# Altium PCB Main.PcbDoc
Units mm, origin at the board's own origin, x right, y up, seen from the top; angles counter-clockwise.
Board outline 29.4 x 44 mm, 2 copper layers (Top Layer, Bottom Layer); 25 components, 25 nets, 85 pads, 11 vias.
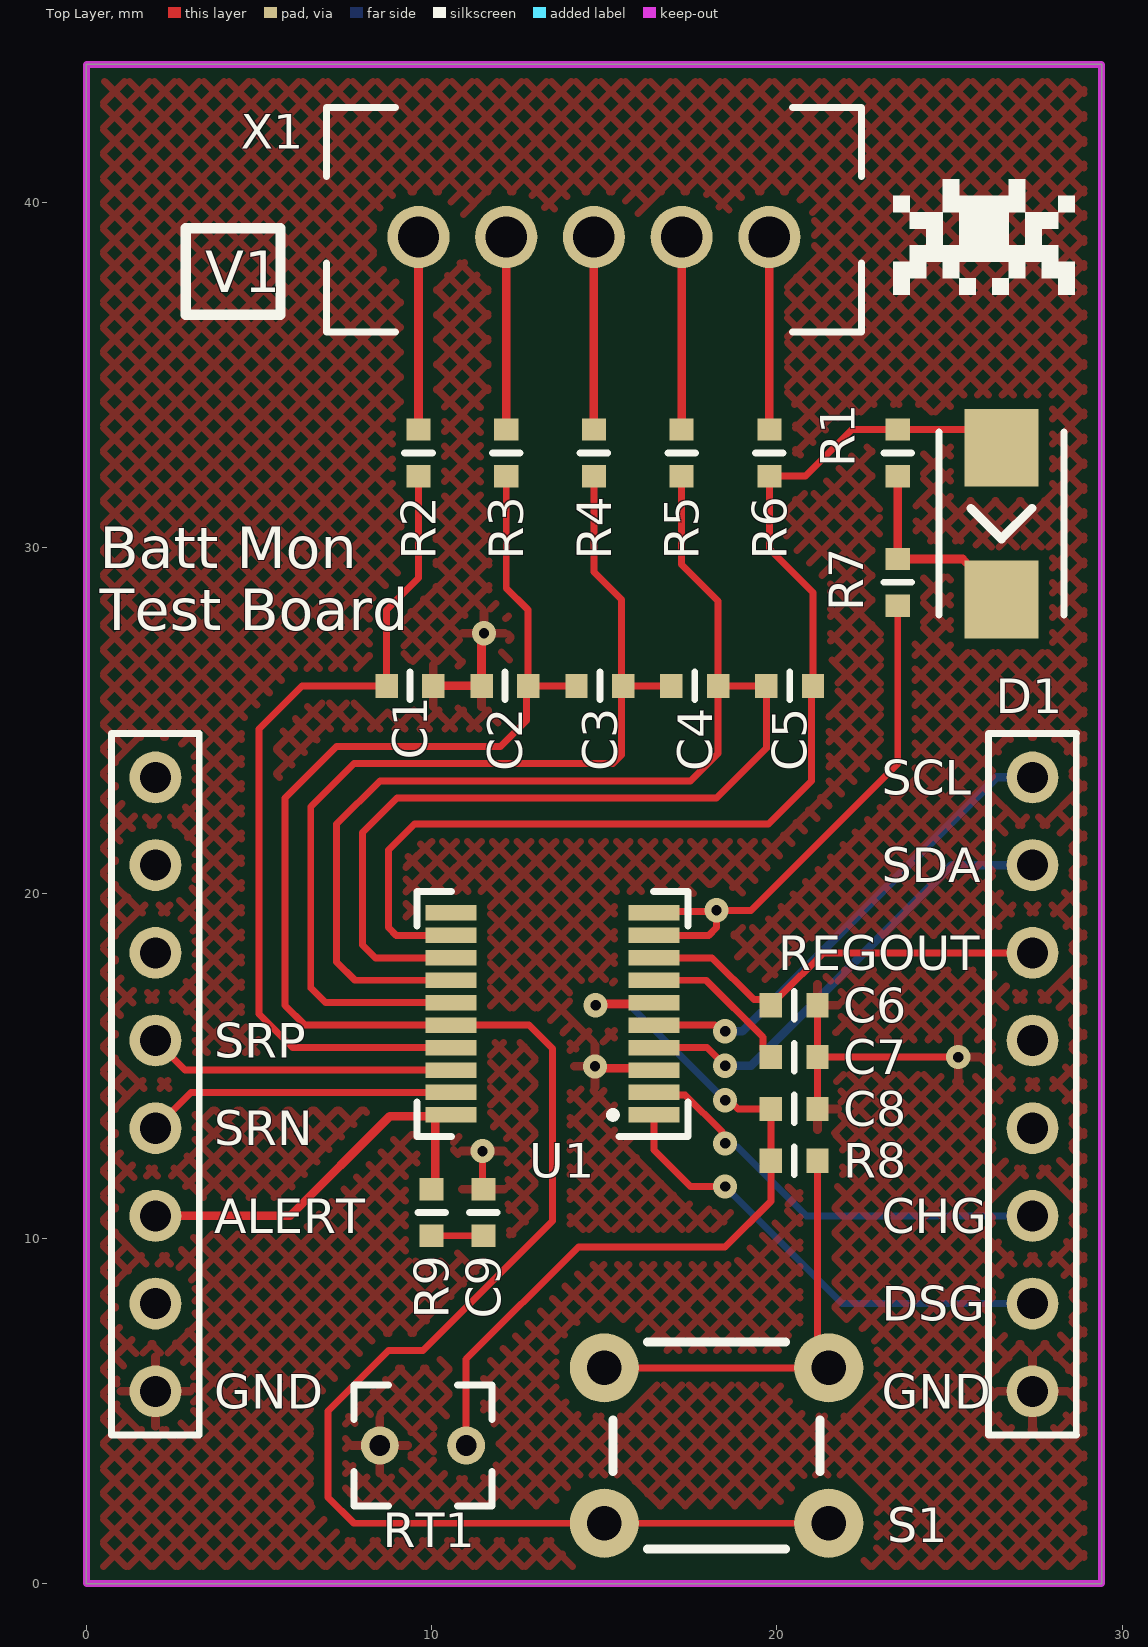
[diagram p0: Top Layer view]
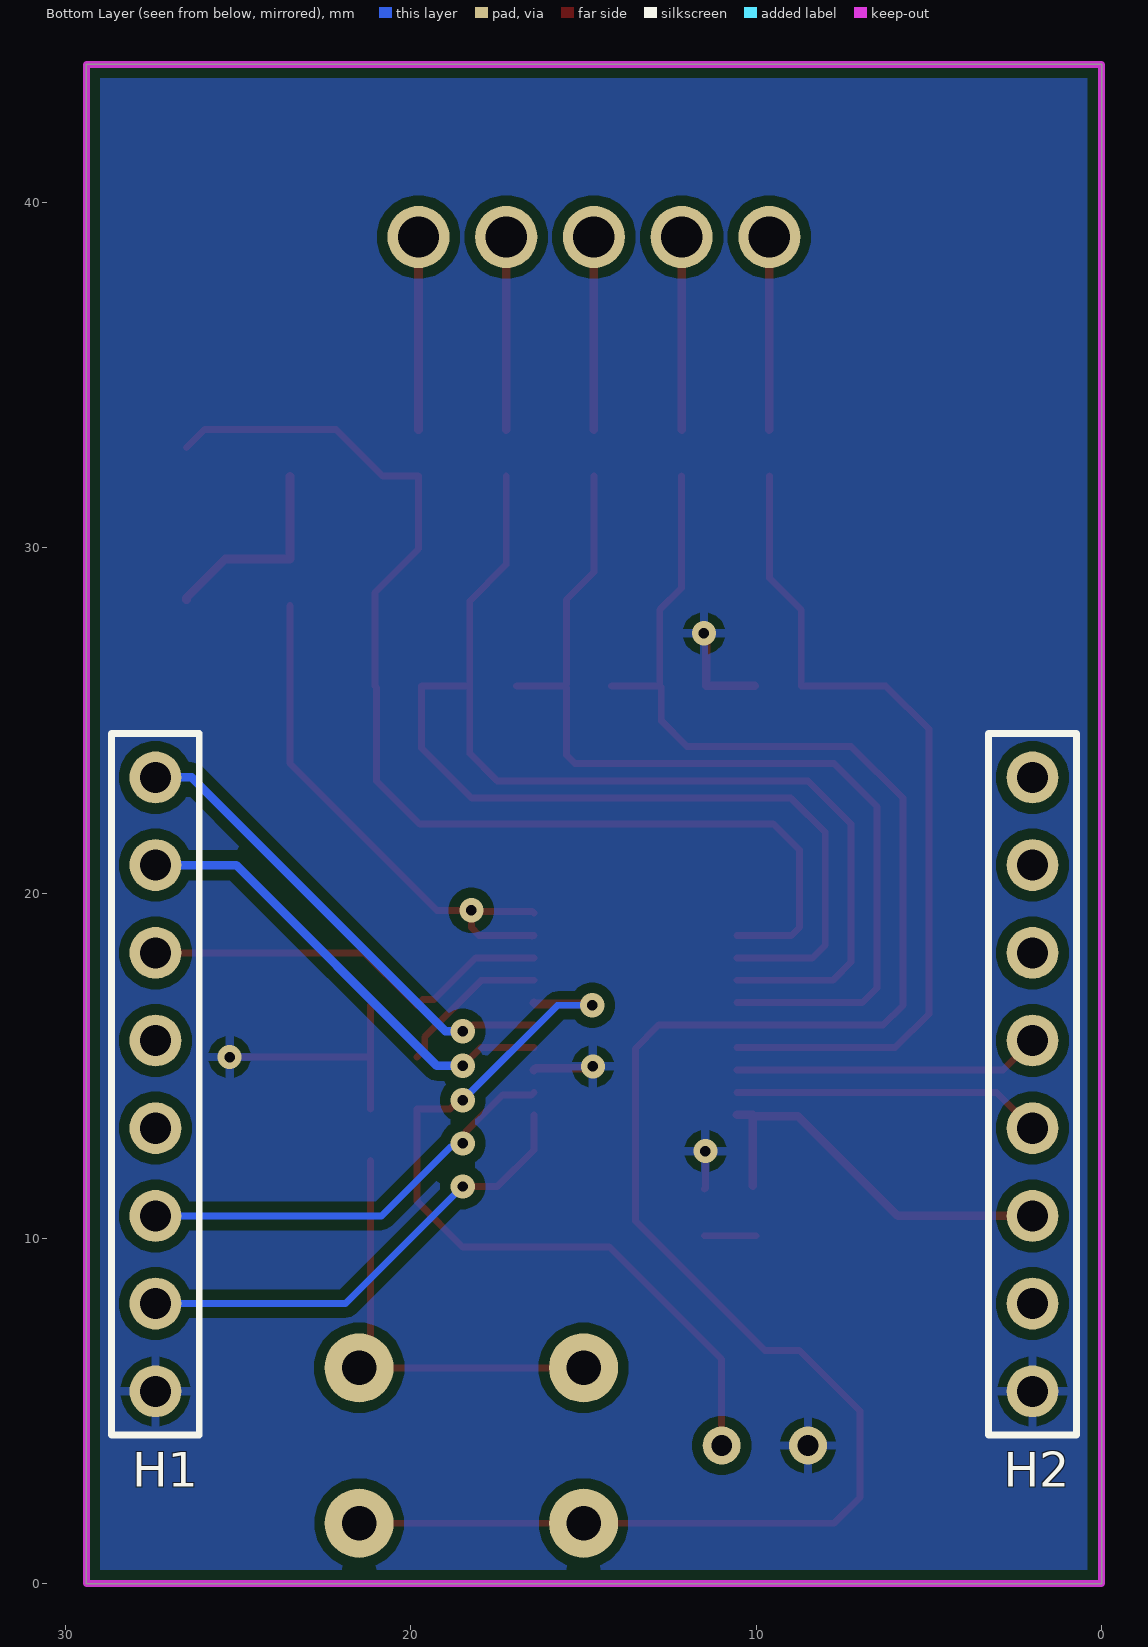
[diagram p1: Bottom Layer view, seen from below]
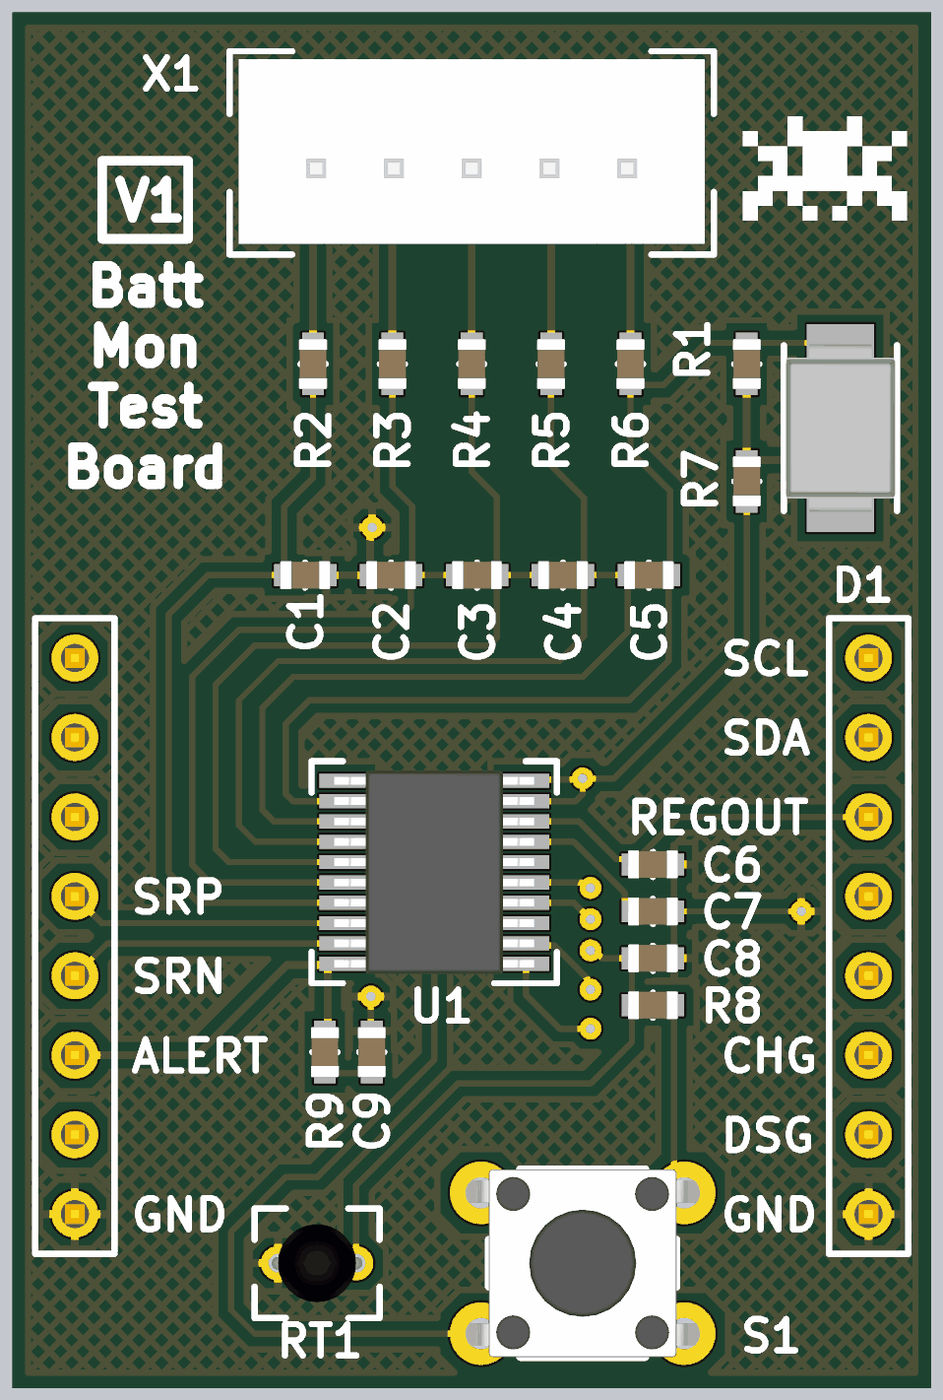
[diagram p2: 3D render of the assembled board from above, using the file's embedded part models]

## Layer stack, top to bottom
Top Solder: solder mask 0.0102, Solder Resist, Dk 3.5
Top Layer: signal copper 0.0356
Dielectric 1: dielectric 0.32, FR-4, Dk 4.8
Bottom Layer: signal copper 0.0356
Bottom Solder: solder mask 0.0102, Solder Resist, Dk 3.5

## Board outline
0,0 0,44 29.4,44 29.4,0

## Design rules (kind name [scope] priority, off if disabled: settings)
BoardOutlineClearance [All] p1: gap=0.2 ignorepadtopadclearanceinfootprint=FALSE
Clearance "inPolygon Clearance" [InPolygon] p1: gap=0.3 ignorepadtopadclearanceinfootprint=TRUE // this rule ensures that every net within a polygon of a different net has a set clearance from the poly
Clearance "Different Diff Pair" [All] p2: gap=0.2 ignorepadtopadclearanceinfootprint=TRUE
Clearance "Same Diff Pair" [All] p3: gap=0.1 ignorepadtopadclearanceinfootprint=TRUE
Clearance "Different Nets" [not InAnyDifferentialPair] p4: gap=0.3 ignorepadtopadclearanceinfootprint=TRUE except(0.1: Arc-SMDPad Arc-THPad Arc-Via Arc-Text Track-SMDPad Track-THPad Track-Via Track-Text SMDPad-Text THPad-Text Via-Text Fill-Text Poly-Text Region-Text Text-Text; 0.12: Arc-Arc Arc-Track Track-Track; 0.15: SMDPad-SMDPad SMDPad-THPad SMDPad-Via THPad-THPad THPad-Via Via-Via; 0.2: Arc-Hole Track-Hole SMDPad-Hole THPad-Hole Via-Hole Fill-Hole Poly-Hole Region-Hole Text-Hole)
Clearance "Same Net" [not InAnyDifferentialPair] p5: gap=0 ignorepadtopadclearanceinfootprint=TRUE except(0.1: THPad-Via; 0.18: Arc-Arc Arc-Track Track-Track)
ComponentClearance [All] p1: gap=0.102 collisioncheckmode=3 verticalgap=0.102 showdistances=TRUE
DiffPairsRouting "Ethernet Routing" [InDifferentialPairClass('Ethernet_Pairs')] p1: maxlimit=0.2 minlimit=0.2 mostfreqgap=0.2 toplayer_minwidth=0.25 toplayer_maxwidth=0.25 toplayer_prefwidth=0.25 bottomlayer_minwidth=0.25 bottomlayer_maxwidth=0.25 bottomlayer_prefwidth=0.25 impedanceprofiledriven=TRUE maxuncoupledlength=12.7
DiffPairsRouting "USB Routing" [InDifferentialPairClass('USB_Pairs')] p2: maxlimit=0.127 minlimit=0.127 mostfreqgap=0.127 toplayer_minwidth=0.23 toplayer_maxwidth=0.23 toplayer_prefwidth=0.23 bottomlayer_minwidth=0.23 bottomlayer_maxwidth=0.23 bottomlayer_prefwidth=0.23 impedanceprofiledriven=TRUE impedanceprofileid={F14BA31F-77FA-453E-8734-53F45B48A614} maxuncoupledlength=12.7
DiffPairsRouting "CAN Routing" [InDifferentialPairClass('CAN_Pairs')] p3: maxlimit=0.5 minlimit=0.5 mostfreqgap=0.5 toplayer_minwidth=0.201 toplayer_maxwidth=0.201 toplayer_prefwidth=0.201 bottomlayer_minwidth=0.201 bottomlayer_maxwidth=0.201 bottomlayer_prefwidth=0.201 maxuncoupledlength=12.7
Height [All] p1: minheight=0 maxheight=1816.048 prefheight=12.7
HoleSize [All] p1: absolutevalues=TRUE maxlimit=6.3 minlimit=0.3 maxpercent=80.000 minpercent=20.000
HoleToHoleClearance [All] p1: gap=0.25 allowstackedmicrovias=FALSE
Length [All] p1: maxlimit=43.432 minlimit=0 usedelayunits=TRUE mindelay=0.000000 maxdelay=10000.000000
MatchedLengths "Diff Pair Matched Delays" [InDifferentialPairClass('Ethernet_Pairs') or InDifferentialPairClass('USB_Pairs') or InDifferentialPairClass('CAN_Pairs')] p1: tolerance=5 checknetsindiffpair=TRUE checkdiffpairvsdiffpair=FALSE checkxsignals=FALSE checkothers=FALSE usedelayunits=TRUE delaytolerance=100.000000
MinimumAnnularRing [All] p1: minimumring=0.2
MinimumSolderMaskSliver [All] p1: minsoldermaskwidth=0
PlaneClearance "Supply Net Clearance" [InNetClass('Supply_Nets')] p1: clearance=0.5
PlaneClearance "All Nets" [All] p2: clearance=0.3
PolygonConnect "Supply Nets" [InNetClass('Supply_Nets')] p1: connectstyle=Relief reliefconductorwidth=0.3 reliefentries=4 polygonreliefangle="90 Angle" conductorbypadedge=TRUE mindistance=0.381 enablemindistance=FALSE airgapwidth=0.254
PolygonConnect General [All] p2: connectstyle=Relief reliefconductorwidth=0.254 reliefentries=4 polygonreliefangle="90 Angle" airgapwidth=0.254
RoutingVias [All] p1: holewidth=0.2 width=0.35 viastyle="Through Hole" minholewidth=0.15 minwidth=0.3 maxholewidth=6.3 maxwidth=6.55
SilkToSilkClearance [All] p1: silktosilkclearance=0
SilkToSolderMaskClearance [All] p1: minsilkscreentomaskgap=0 clearancetoexposedcopper=TRUE
SolderMaskExpansion [All] p1: expansion=0.075 istentingtop=FALSE
SupplyNets "Schematic Supply Nets_3" [InNet('GND')] p1: voltage=0.000
UnRoutedNet [All] p1: checkbadconnections=TRUE
Width "nRF Width" [InNetClass('nRF Signal')] p1: maxlimit=0.379 minlimit=0.379 preferedwidth=0.379 impedanceprofiledriven=TRUE minimp=50.000000 maximp=50.000000 favimp=50.000000 checkconnectedcopper=TRUE
Width [All] p2: maxlimit=100 minlimit=0.1 preferedwidth=0.3
20 further rules are at their usual default settings.

## Classes and differential pairs
component class Connectors: H1 H2 X1
component class "Battery Monitoring": C1 C2 C3 C4 C5 C6 C7 C8 C9 D1 R1 R2 R3 R4 R5 R6 R7 R8 R9 RT1 S1 U1

## Components (designator, comment, footprint, x,y, rotation, side; value= is the part's Value field where it differs from the comment)
C1 "[Cap] 0603 1uF 10% 50V" "[Cap] SMD 0603" 9.37,26 r0 top (schematic designator C30)
C2 "[Cap] 0603 1uF 10% 50V" "[Cap] SMD 0603" 12.12,26 r0 top (schematic designator C29)
C3 "[Cap] 0603 1uF 10% 50V" "[Cap] SMD 0603" 14.87,26 r0 top (schematic designator C28)
C4 "[Cap] 0603 1uF 10% 50V" "[Cap] SMD 0603" 17.62,26 r0 top (schematic designator C27)
C5 "[Cap] 0603 1uF 10% 50V" "[Cap] SMD 0603" 20.37,26 r0 top (schematic designator C25)
C6 "[Cap] 0603 4.7uF 10% 25V" "[Cap] SMD 0603" 20.5,16.75 r180 top (schematic designator C26)
C7 "[Cap] 0603 1uF 10% 50V" "[Cap] SMD 0603" 20.5,15.25 r180 top (schematic designator C31)
C8 "[Cap] 0603 4700pF 5% 50V" "[Cap] SMD 0603" 20.5,13.75 r180 top (schematic designator C32)
C9 "[Cap] 0603 470pF 5% 50V" "[Cap] SMD 0603" 11.5,10.75 r270 top (schematic designator C33)
D1 "Rectifier" "[Diode] SMD DO-214AA" 26.5,30.7 r270 top
H1 "1x8 Header" "[Header] 1x8 Male" 27.4,23.35 r270 bottom (schematic designator H2)
H2 "1x8 Header" "[Header] 1x8 Male" 2,23.35 r270 bottom (schematic designator H1)
R1 "[10k] SMD 0603 1% 1/8W" "[Res] SMD 0603" 23.5,32.75 r90 top (schematic designator R15)
R2 "[100] SMD 0603 1% 1/10W" "[Res] SMD 0603" 9.62,32.75 r270 top (schematic designator R14)
R3 "[100] SMD 0603 1% 1/10W" "[Res] SMD 0603" 12.16,32.75 r270 top (schematic designator R13)
R4 "[100] SMD 0603 1% 1/10W" "[Res] SMD 0603" 14.7,32.75 r270 top (schematic designator R12)
R5 "[100] SMD 0603 1% 1/10W" "[Res] SMD 0603" 17.24,32.75 r270 top (schematic designator R11)
R6 "[100] SMD 0603 1% 1/10W" "[Res] SMD 0603" 19.78,32.75 r270 top (schematic designator R10)
R7 "[100] SMD 0603 1% 1/10W" "[Res] SMD 0603" 23.5,29 r270 top (schematic designator R16)
R8 "[3.3k] SMD 0603 1% 1/10W" "[Res] SMD 0603" 20.5,12.25 r180 top (schematic designator R17)
R9 "[499k] SMD 0603 1% 1/8W" "[Res] SMD 0603" 10,10.75 r270 top (schematic designator R18)
RT1 "[NTC] 10k Thru-Hole" "[NTC] 10k Thru-Hole" 9.75,4 r0 top
S1 "Standard pushbutton" "[SPST] Pushbutton" 18.25,4 r0 top (schematic designator S3)
U1 "[Batt Mon] 3-5 Cell BMS" "[Batt Mon] 3-5 Cell BMS" 13.5,16.5 r180 top (schematic designator U5)
X1 "[JST] 5pin Female" "[JST] 5pin Female" 14.7,39 r0 top (schematic designator X4)

## Footprints (in the part's own frame and the unit in brackets; to place one, negate y for a bottom-side part, rotate by r counter-clockwise, add the part's x,y. Pads: shape width x height; smd on the part's side, far side on the other; paste and mask are expansions set on the pad)
"[Batt Mon] 3-5 Cell BMS" [mm] "BQ7692006PWR"
  rect 1.475x0.45 smd: 1(-2.938,2.925) 2(-2.938,2.275) 3(-2.938,1.625) 4(-2.938,0.975) 5(-2.938,0.325) 6(-2.938,-0.325) 7(-2.938,-0.975) 8(-2.938,-1.625) 9(-2.938,-2.275) 10(-2.938,-2.925) 11(2.938,-2.925) 12(2.938,-2.275) 13(2.938,-1.625) 14(2.938,-0.975) 15(2.938,-0.325) 16(2.938,0.325) 17(2.938,0.975) 18(2.938,1.625) 19(2.938,2.275) 20(2.938,2.925)
  silkscreen extent -3.92,-3.55 3.93,3.55, body extent -3.2,-3.25 3.2,3.25, height 1.13
"[Cap] SMD 0603" [mm]
  rect 0.65x0.7 smd: 1(-0.675,0) 2(0.675,0)
  silkscreen extent 0,-0.4 0,0.4, body extent -0.8,-0.45 0.8,0.45, height 0.8
"[Diode] SMD DO-214AA" [mm]
  rect 2.25x2.15 smd: 1(2.2,0) 2(-2.2,0)
  silkscreen extent -2.65,-1.81 2.65,1.81, body extent -2.68,-1.75 2.68,1.75, height 2.3
"[Header] 1x8 Male" [mm]
  round 1.5 hole 0.9: 1(0,0) 2(2.54,0) 3(5.08,0) 4(7.62,0) 5(10.16,0) 6(12.7,0) 7(15.24,0) 8(17.78,0)
  silkscreen extent -1.27,-1.27 19.05,1.27, body extent -1.27,-1.27 19.05,1.27, height 9.5
"[JST] 5pin Female" [mm]
  round 1.8 hole 1.2: 1(-5.08,0) 2(-2.54,0) 3(0,0) 4(2.54,0) 5(5.08,0)
  silkscreen extent -7.75,-2.75 7.75,3.75, body extent -7.45,-2.41 7.45,3.5, height 7.14
"[NTC] 10k Thru-Hole" [mm]
  round 1.1 hole 0.6: 1(-1.25,0) 2(1.25,0)
  silkscreen extent -2,-1.75 2,1.75, body extent -1.45,-1.25 1.45,1.25, height 7.81
"[Res] SMD 0603" [mm]
  rect 0.65x0.7 smd: 1(-0.675,0) 2(0.675,0)
  silkscreen extent 0,-0.4 0,0.4, body extent -0.8,-0.45 0.8,0.45, height 0.8
"[SPST] Pushbutton" [mm] "(Regular pushbutton)"
  round 2 hole 1: 1(-3.25,2.25) 1(3.25,2.25) 2(-3.25,-2.25) 2(3.25,-2.25)
  silkscreen extent -3,-3 3,3, body extent -3.85,-3 3.85,3, height 4.95

## Part data
C1 C2 C3 C4 C5 C7: "UMK107AB7105KA-T", Capacitance=1uF, Max Voltage=50V, Size Package=0603, Supplier Part Number 1=587-3247-1-ND, Tolerance=10%, Supplier 1=DigiKey
C6: "GRM188R61E475KE11D", Capacitance=4.7uF, Max Voltage=25V, Size Package=0603, Supplier Part Number 1=490-7203-6-ND, Tolerance=10%, Supplier 1=DigiKey
C8: "GRM1885C1H472JA01D", Capacitance=4700pF, Max Voltage=50V, Size Package=0603, Supplier Part Number 1=490-9669-6-ND, Tolerance=5%, Supplier 1=DigiKey
C9: "C0603C471J5GACTU", Capacitance=470pF, Max Voltage=50V, Size Package=0603, Supplier Part Number 1=399-C0603C471J5GACTUDKR-ND, Tolerance=5%, Supplier 1=DigiKey
D1: library part "[Rectifier] SMD 1000V 1A", "S1MB-13-F", Package=DO-214AA, Supplier Part Number 1=S1MB-FDICT-ND, Supplier 1=DigiKey
H1 H2: library part "[Header] 1x8 Male", "2.54mm pitch"
R1: "RMCF0603FT10K0", Resistance=10k, Size Package=0603, Supplier Part Number 1=RMCF0603FT10K0DKR-ND, Tolerance=1%, Supplier 1=DigiKey, Wattage=1/10W
R2 R3 R4 R5 R6 R7: "RC0603FR-07100RL", Resistance=100, Size Package=0603, Supplier Part Number 1=311-100HRDKR-ND, Tolerance=1%, Supplier 1=DigiKey, Wattage=1/10W
R8: "RC0603FR-073K3L", Resistance=3.3k, Size Package=0603, Supplier Part Number 1=311-3.30KHRCT-ND, Tolerance=1%, Supplier 1=DigiKey, Wattage=1/10W
R9: "CRCW0603499KFKEA", Resistance=499k, Size Package=0603, Supplier Part Number 1=541-499KHCT-ND, Tolerance=1%, Supplier 1=DigiKey, Wattage=1/8W
RT1: "B57164K0103J000", Max Resistance=10k, Size Package=Thru-Hole, Supplier Part Number 1=495-2080-ND, Supplier 1=DigiKey, Thermistor Type=NTC
S1: library part "[SPST] Pushbutton", Supplier Part Number 1=450-1650-ND, Supplier 1=DigiKey
U1: "BQ7692006PWR", Supplier Part Number 1=296-39960-1-ND, Supplier 1=DigiKey

## Via types
v1: diameter 0.7, hole 0.3, Top Layer to Bottom Layer, 11 vias

## Nets (pads, with @x,y where several pads share a name; then routed paths per layer and width w, separated by ;. In a path a pad name is that pad's centre, name@x,y a point inside that pad or via, vN(x,y) a via of type N, cw(c..) or ccw(c..) an arc to the next point about the centre after c; other vN are vias at no path point)
ALERT: C9.2 R9.2 | length 1.5
  Top Layer w0.2: R9.2 C9.2
ALERT_PIN: H2.6 R9.1 U1.20 | length 11.7
  Top Layer w0.25: H2.6 5.9,10.65 8.787,13.537 U1.20@10,13.537 ; R9.1@10.1,11.525 10.1,13.575 U1.20
BAT: R7.2 U1.9 U1.10 | length 15.9
  Top Layer w0.2: U1.9 16.475,18.775 16.5,18.75 16.525,18.775 18.025,18.775 18.25,19 v1(18.25,19.5) ; U1.10 16.475,19.462 18.212,19.462 v1(18.25,19.5) ; R7.2 23.5,23.75 19.25,19.5 v1(18.25,19.5)
Cell0: R2.1 X1.1 | length 5.6
  Top Layer w0.25: R2.1 X1.1
Cell1: R3.1 X1.2 | length 5.6
  Top Layer w0.25: R3.1 X1.2
Cell2: R4.1 X1.3 | length 5.6
  Top Layer w0.25: R4.1 X1.3
Cell3: R5.1 X1.4 | length 5.6
  Top Layer w0.25: R5.1 X1.4
Cell4: R6.1 X1.5 | length 5.6
  Top Layer w0.25: R6.1 X1.5
CHG: H1.6 U1.2 | length 12.6
  Top Layer w0.2: U1.2 16.507,14.156 17.344,14.156 18.404,13.096 18.404,12.846 v1(18.5,12.75)
  Bottom Layer w0.2: v1(18.5,12.75) 18.596,12.654 18.846,12.654 20.85,10.65 H1.6
DSG: H1.7 U1.1 | length 13.8
  Top Layer w0.2: U1.1 16.438,12.562 17.5,11.5 v1(18.5,11.5)
  Bottom Layer w0.2: v1(18.5,11.5) 21.89,8.11 H1.7
GND: C1.2 C2.1 C6.1 C7.1 C8.1 C9.1 H1.8 H2.8 RT1.1 U1.3 | length 12.9
  Top Layer w0.2: v1(11.473,12.527) 11.473,11.452 C9.1 ; C8.1 C7.1 ; C6.1 C7.1 ; v1(25.25,15.25) C7.1
  Top Layer w0.25: C1.2 C2.1 11.445,27.452 v1(11.515,27.522) ; v1(14.731,14.981) 14.784,14.928 16.385,14.928 U1.3
NetC7_2: C7.2 U1.7 | length 4.5
  Top Layer w0.2: U1.7 17.95,17.475 19.6,15.825 19.6,15.475 C7.2
NetD1_1: D1.1 R1.1 R7.1 | length 5.9
  Top Layer w0.25: R1.1 R7.1 25.375,29.675 26.5,28.55 D1.1
NetR8_1: R8.1 S1.1 | length 12.6
  Top Layer w0.2: S1.1@15,6.25 21.5,6.25 21.175,6.575 R8.1
REGOUT: C6.2 H1.3 U1.8 | length 12.2
  Top Layer w0.2: U1.8 18.125,18.125 19.331,16.919 19.656,16.919 C6.2 ; C6.2@19.825,16.775 20.05,17 20.075,17 21.345,18.27 H1.3
SCL0: H1.1 U1.5 | length 14.1
  Top Layer w0.2: U1.5 18.203,16.175 18.378,16 v1(18.5,16)
  Bottom Layer w0.25: v1(18.5,16) 19,16 26.35,23.35 H1.1
SDA0: H1.2 U1.4 | length 13.6
  Top Layer w0.2: U1.4 17.975,15.525 v1(18.5,15)
  Bottom Layer w0.25: v1(18.5,15) 19.25,15 25.06,20.81 H1.2
SRN: H2.5 U1.19 | length 9
  Top Layer w0.2: H2.5 3.035,14.225 U1.19
SRP: H2.4 U1.18 | length 8.9
  Top Layer w0.2: H2.4 2.855,14.875 U1.18
TS1: C8.2 R8.2 RT1.2 U1.6 | length 23.9
  Top Layer w0.2: RT1.2 11,6.5 14.25,9.75 18.5,9.75 19.825,11.075 R8.2 C8.2 18.872,13.75 18.622,14 v1(18.5,14)
  Top Layer w0.25: v1(14.75,16.75) 14.787,16.787 16.4,16.787 U1.6
  Bottom Layer w0.2: v1(14.75,16.75) 15.75,16.75 v1(18.5,14)
VC0: C1.1 R2.2 U1.17 | length 24.9
  Top Layer w0.2: R2.2 9.62,29.12 8.695,28.195 C1.1 6.25,26 5,24.75 5,16.5 5.975,15.525 U1.17
VC1: C2.2 C3.1 R3.2 S1.2 U1.16 | length 62
  Top Layer w0.2: R3.2 12.16,28.84 12.795,28.205 C2.2 ; C3.1 C2.2 ; S1.2@21.5,1.75 15,1.75 7.75,1.75 7,2.5 7,5 8.75,6.75 9.75,6.75 13.5,10.5 13.5,15.5 12.825,16.175 U1.16 6.325,16.175 5.75,16.75 5.75,22.75 7.25,24.25 12,24.25 12.75,25 12.75,25.955 C2.2
VC2: C3.2 C4.1 R4.2 U1.15 | length 29
  Top Layer w0.2: U1.15 6.925,16.825 6.5,17.25 6.5,22.5 7.75,23.75 15.25,23.75 15.5,24 15.5,25.955 C3.2 ; R4.2 14.7,29.3 15.5,28.5 15.5,26.045 C3.2 ; C4.1 C3.2
VC3/4: C4.2 C5.1 R5.2 U1.13 U1.14 | length 49.8
  Top Layer w0.2: U1.14 7.775,17.475 7.25,18 7.25,22 8.5,23.25 17.5,23.25 18.295,24.045 C4.2 ; U1.13 8.375,18.125 8,18.5 8,21.75 9,22.75 18.25,22.75 19.695,24.195 C5.1 C4.2 ; R5.2 17.24,29.51 18.295,28.455 C4.2
VC5: C5.2 D1.2 R1.2 R6.2 U1.12 | length 34.1
  Top Layer w0.2: U1.12 8.975,18.775 8.75,19 8.75,21.25 9.5,22 19.75,22 21,23.25 21,25.955 C5.2 21.045,28.705 19.78,29.97 R6.2 20.825,32.075 22.175,33.425 R1.2 25.975,33.425 D1.2
pads on no net: H1.4 H1.5 H2.1 H2.2 H2.3 H2.7 U1.11

## Polygon pours and split planes (outlines as drawn)
GND on Top Layer "Top GND Poly" (hatched 45Degree grid 0.508 track 0.203, remove dead copper, pour order 0): 0,44 29.4,44 29.4,0 0,0
GND on Bottom Layer "Bottom GND Poly" (solid, remove dead copper, pour order 1): 0,44 29.4,44 29.4,0 0,0

## Keep-outs
Keep-Out Layer:
  the board outline again, w0.2

## Silkscreen, mask and mechanical layers (free items; w line width, h text height)
Top Overlay:
  region: 25.463,37.33 25.284,37.33 25.284,37.807 25.761,37.807 25.761,37.806 25.761,37.33 25.463,37.33
  region: 23.375,40.059 23.375,40.193 23.852,40.193 23.852,39.716 23.375,39.716 23.375,40.059
  region: 28.148,39.863 28.148,40.193 28.625,40.193 28.625,39.716 28.148,39.716 28.148,39.862
  region: 26.716,37.769 26.716,37.33 26.239,37.33 26.239,37.806 26.239,37.807 26.716,37.807 26.716,37.77
  region: 24.815,40.671 25.284,40.671 25.284,40.193 26.716,40.193 26.716,40.671 27.193,40.671 27.193,39.716 26.716,39.716 26.716,38.761 27.193,38.761 27.193,39.716 28.148,39.716 28.148,39.239 28.147,39.239 27.671,39.239 27.671,38.761 28.147,38.761 28.148,38.761 28.148,38.284 28.625,38.284 28.625,37.33 28.148,37.33 28.148,37.807 27.671,37.807 27.671,37.808 27.671,38.284 27.193,38.284 27.193,37.808 27.193,37.807 26.716,37.807 26.716,38.284 25.284,38.284 25.284,37.807 24.808,37.807 24.808,37.808 24.807,37.808 24.807,38.284 24.33,38.284 24.33,37.808 24.329,37.808 24.329,37.807 23.852,37.807 23.852,37.33 23.375,37.33 23.375,38.284 23.852,38.284 23.852,38.761 23.853,38.761 24.33,38.761 24.33,39.239 23.853,39.239 23.852,39.239 23.852,39.716 24.807,39.716 24.807,38.761 25.284,38.761 25.284,39.716 24.807,39.716 24.807,40.671 24.815,40.671
  lines w0.3: 2.875,36.75 5.625,36.75 5.625,39.25 2.875,39.25 2.875,36.75
  text "V1" at 3.45,37.4 h1.2
  text "Batt Mon / Test Board" at 0.385,27.611 h1.2
  text "SCL" at 23.034,22.85 h1
  text "SDA" at 23.034,20.31 h1
  text "REGOUT" at 20.035,17.77 h1
  text "SRP" at 3.7,15.23 h1
  text "SRN" at 3.7,12.69 h1
  text "ALERT" at 3.7,10.15 h1
  text "CHG" at 23.034,10.15 h1
  text "DSG" at 23.034,7.61 h1
  text "GND" at 3.7,5.07 h1
  text "GND" at 23.034,5.07 h1